# Altium PCB Solenoid-Board-v2.0.PcbDoc (part 3 of 3)
Units mil, origin at the board's own origin, x right, y up, seen from the top; angles counter-clockwise.
Board outline 3149.61 x 4330.71 mil, 2 copper layers (Top Layer, Bottom Layer), stack 61.811 mil thick; 169 components, 111 nets, 466 pads, 161 vias.
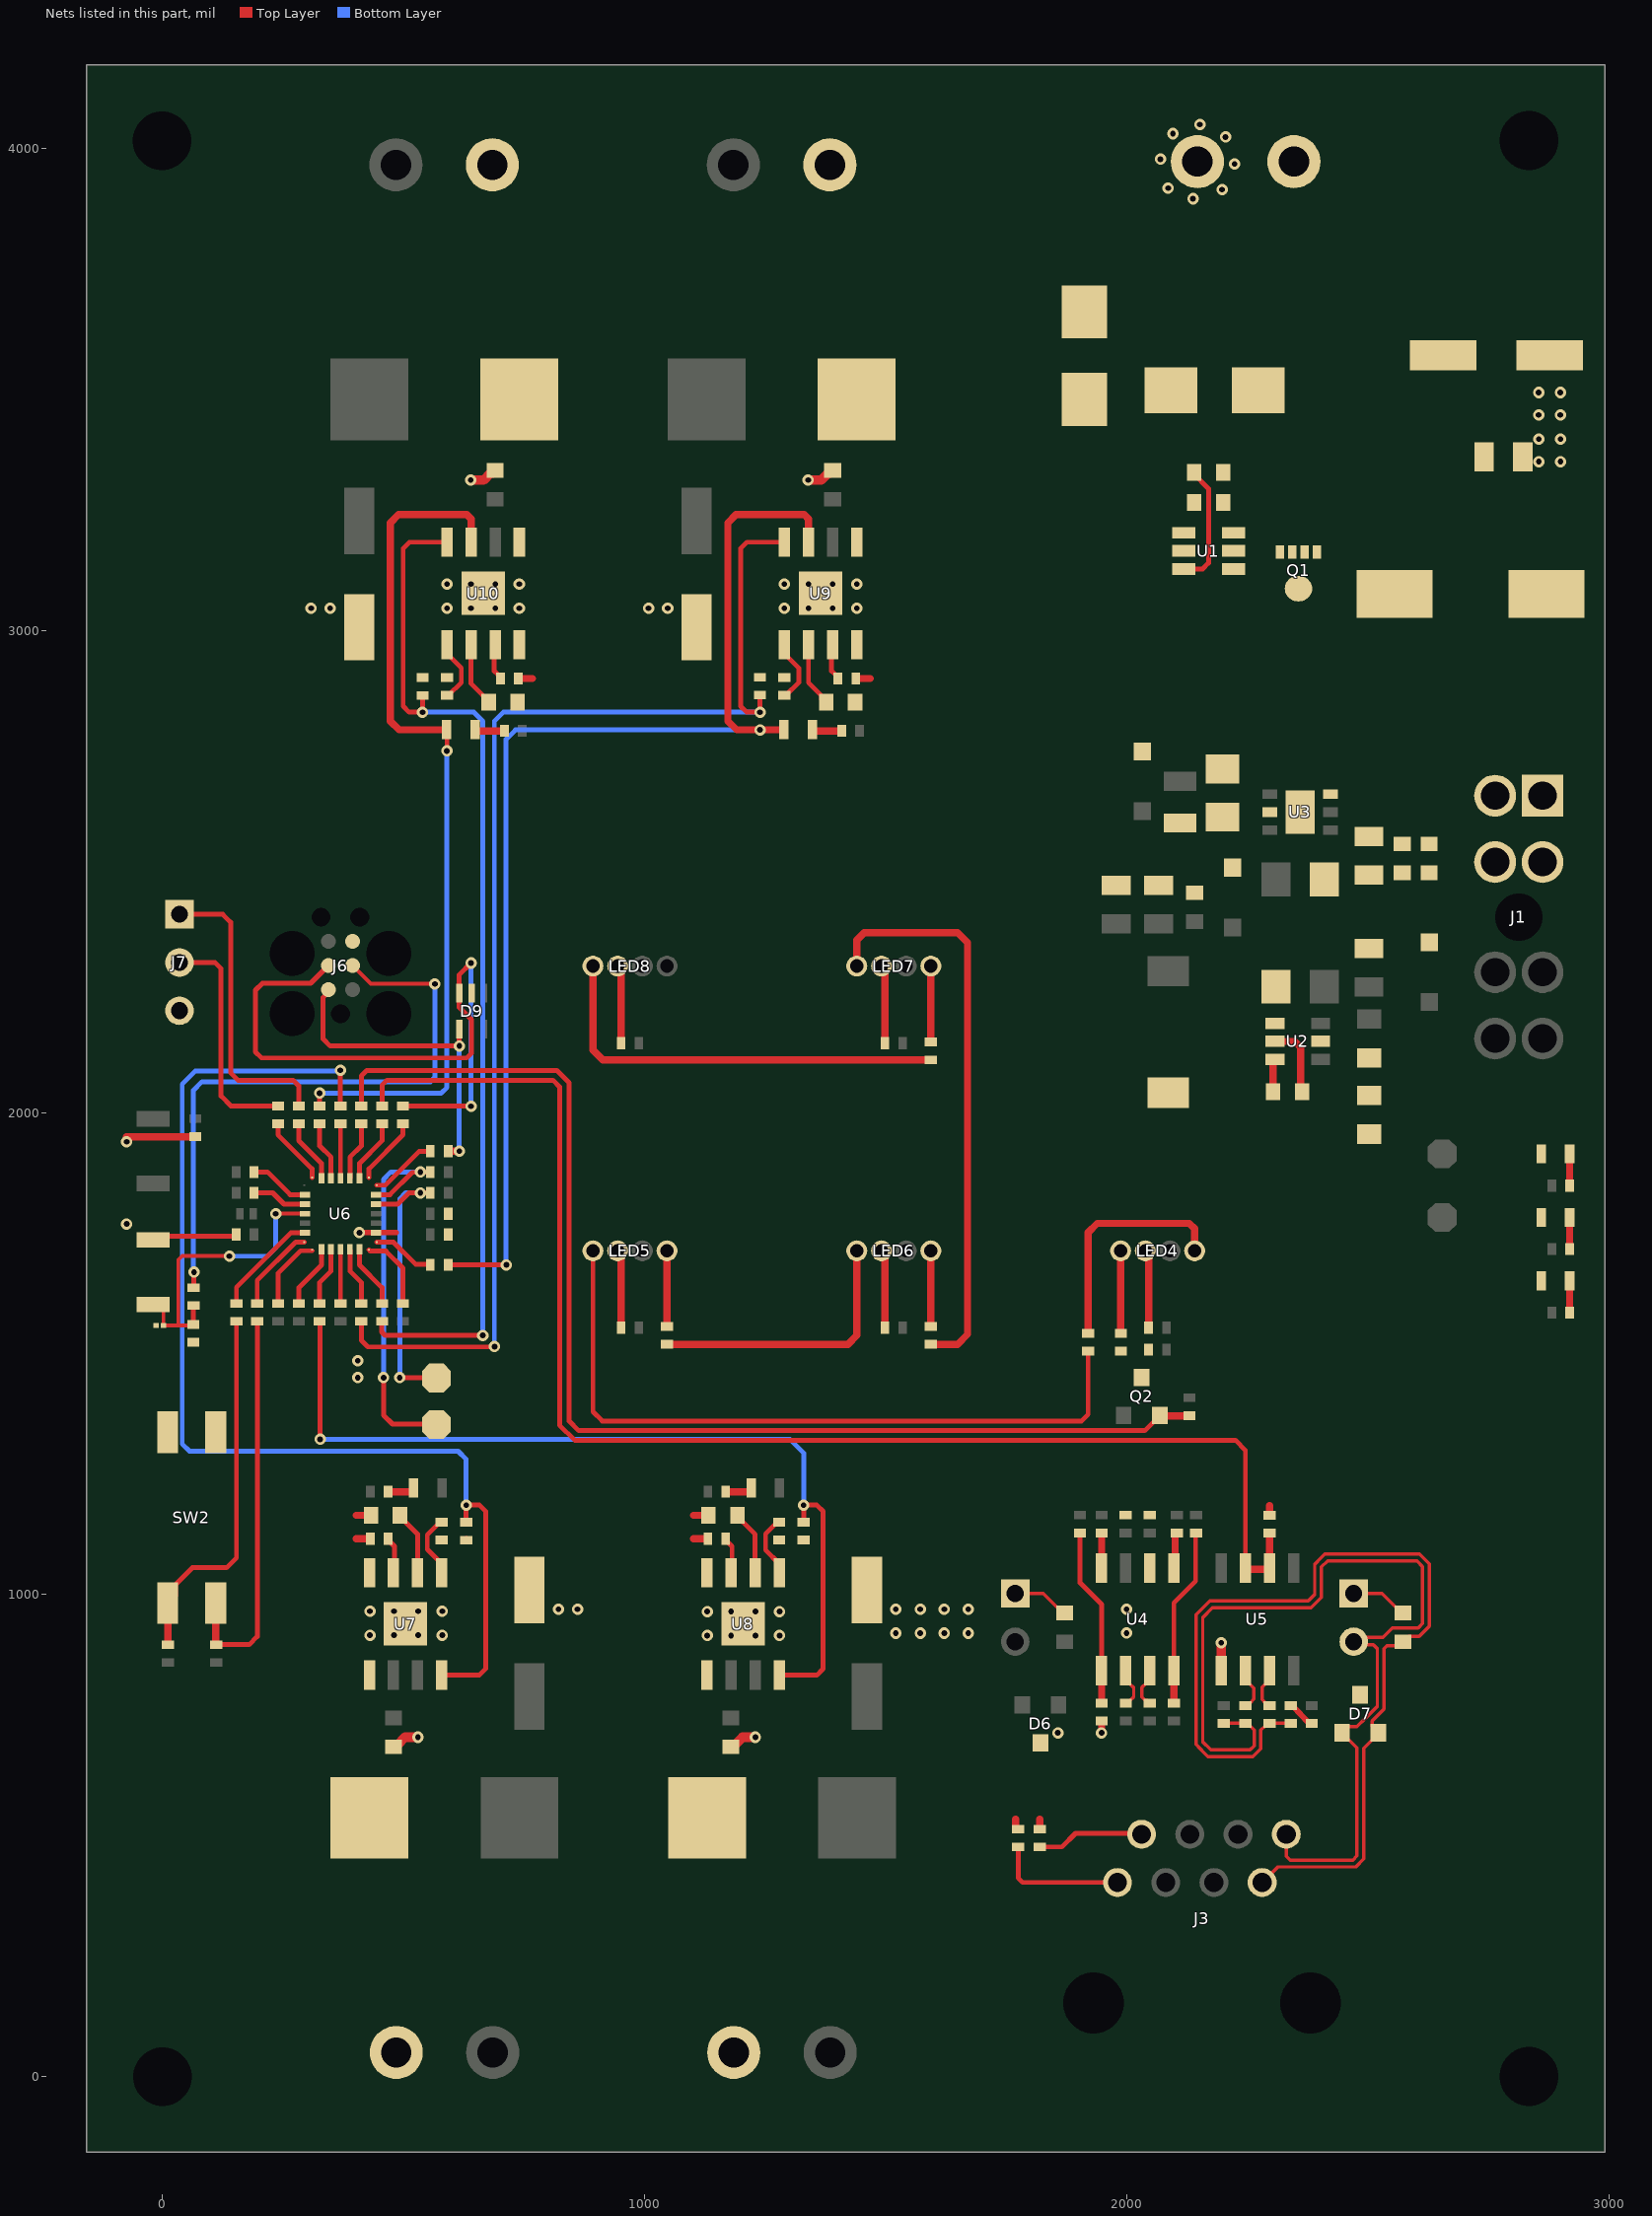
[diagram p2: the nets of this part, all layers, seen from the top]

## Via types
v1: diameter 23.62, hole 11.81, Top Layer to Bottom Layer, tented both sides, 161 vias

## Nets (pads, with @x,y where several pads share a name; then routed paths per layer and width w, separated by ;. In a path a pad name is that pad's centre, name@x,y a point inside that pad or via, vN(x,y) a via of type N, cw(c..) or ccw(c..) an arc to the next point about the centre after c; other vN are vias at no path point) (continued)
DI_PB1: LED11.2 R29.1 U9.7 | length 2507.9
  Top Layer w6: R29.1@594.43,1681.38 R29.1@596.85,1683.81
  Top Layer w10: R29.1@596.85,1683.81 v1(713.47,1683.81) ; LED11.2@1288.42,2795.4 LED11.2@1289.31,2794.51
  Top Layer w15: LED11.2@1290.15,2793.67 v1(1239.42,2793.67) 1191.13,2793.67 1172.83,2811.97 1172.83,3223.1 1189.73,3240 1331.36,3240 1340.15,3231.21 U9.7@1340.15,3182.98
  Bottom Layer w10: v1@712.64,1684.64 712.64,2774.21 732.1,2793.67 v1(1239.42,2793.67)
DI_PB5: LED12.2 R36.1 U10.7 | length 1801.4
  Top Layer w10: R36.1@326.15,2013.32 v1(326.15,2040) ; LED12.2@589.31,2794.51 590.2,2793.62 590.2,2750.91 v1@591.1,2750.02
  Top Layer w15: LED12.2@590.15,2793.67 491.13,2793.67 472.83,2811.97 472.83,3223.1 489.73,3240 631.36,3240 640.15,3231.21 U10.7@640.15,3182.98
  Bottom Layer w10: v1(326.15,2040) 578.04,2040 590,2051.96 590,2748.92 v1@591.1,2750.02
  other v1: 590,2750.02
DO_PA15: R22.1 R48.1 U5.2 U5.3 | length 2956.4
  Top Layer w10: R48.1@455.68,2013.32 455.68,2056.59 465.93,2066.83 810.26,2066.83 823.87,2053.22 823.87,1351.41 855.29,1320 2225.67,1320 2246.38,1299.28 U5.3@2246.38,1055.05 ; R22.1@2296.36,1127.35 2296.44,1127.27 2296.44,1103.43 2296.52,1103.35
  Top Layer w15: U5.3@2248.74,1052.7 2294.03,1052.7 U5.2@2296.36,1055.03 ; U5.2@2296.36,1055.07 R22.1@2296.36,1127.35
GND: C1.2 C2.2 C3.1 C4.1 C5.1 C6.1 C9.1 C10.1 C11.1 C12.1 C13.1 C14.1 C15.1 C16.1 C17.1 C18.1 C19.1 C20.1 C21.1 C22.1 C23.1 C24.1 C25.2 C26.2 C27.2 C28.2 C29.2 C30.1 C31.1 C32.1 C33.1 C34.2 C35.2 C36.1 C37.1 C38.1 C39.1 D2.1 D3.2 D4.1 D5.1 D6.3 D7.3 D8.1 D9.2 J2.1 J6.5 J7.3 LED1.2 LED2.2 LED3.2 LED4.3 LED5.3 LED6.3 LED7.3 LED8.3 R4.1 R12.1 R13.1 R18.1 R22.2 R51.1 R55.1 R56.1 R57.1 R58.1 R59.1 R60.1 R63.1 R64.1 R65.1 R66.1 R67.1 R68.1 R72.2 SW1.2 SW2.3 SW2.4 U1.2 U2.4 U3.6 U3.7 U4.2 U5.5 U6.16 U7.4 U7.9 U8.4 U8.9 U9.4 U9.9 U10.4 U10.9 | length 1822.5
  Top Layer w8: R13.1@1769.96,513.46 R13.1@1770,513.5 ; R12.1@1819.96,513.46 R12.1@1820,513.5 ; C16.1@1997.55,1164.8 C16.1@1997.59,1164.84 ; R22.2@2296.36,1164.35 R22.2@2296.37,1164.35 ; C17.1@2048.05,1164.81 C17.1@2048.09,1164.84
  Top Layer w10: SW1.2@-19.36,1735.64 -11.62,1743.38 142.57,1743.38 ; C27.2@149.57,1743.38 C27.2@153.08,1746.89
  Top Layer w11: v1(408.7,1750.7) U6.16@443.15,1750.7 485.25,1750.7
  Top Layer w12: R72.2@2340.38,769.84 2346.88,766.84 C19.1@2375.88,735.34
  Top Layer w15: v1@-74.27,1949.09 -73.73,1949.63 67.4,1949.63 R51.1@67.93,1950.16 ; 401.7,1164.52 C31.1@432.77,1164.52 C31.1@437.77,1164.52 ; 401.74,1115.72 R57.1@431.27,1115.72 ; R55.1@630,1113.81 R55.1@630,1114.4 ; R68.1@738.15,2900.02 767.68,2900.03 ; LED5.3@944.24,1713.57 951.48,1706.33 C22.1@951.48,1553.71 ; LED8.3@944.24,2303.57 951.48,2296.33 C18.1@951.48,2143.71 ; 1101.7,1164.52 C33.1@1137.77,1164.52 ; 1101.74,1115.72 R60.1@1131.27,1115.72 ; R65.1@1438.15,2900.03 1467.68,2900.03 ; LED6.3@1491.37,1713.57 1498.6,1706.33 C21.1@1498.6,1553.71 ; LED7.3@1491.36,2303.57 1498.6,2296.33 C23.1@1498.6,2143.71 ; R13.1@1770,513.5 1770,534.12 ; R12.1@1820,513.5 1820,534.12 ; v1(1948.09,713.23) 1948.09,727.54 ; 1948.09,727.56 R18.1@1948.09,737.85 ; LED4.3@2034.89,1709.19 2045.7,1698.38 C20.1@2045.7,1553.02 ; R22.2@2296.37,1164.35 2296.37,1184.97
  Top Layer w20: C30.1@479.27,684.05 484.27,689.05 488.17,689.05 503.17,704.05 v1(530,704.05) ; v1(639.41,3311.71) 666.24,3311.71 681.24,3326.71 685.14,3326.71 C38.1@690.14,3331.71 ; C32.1@1179.28,684.04 1184.28,689.04 1188.18,689.04 1203.18,704.04 v1(1230,704.04) ; v1(1339.42,3311.7) 1366.24,3311.7 1381.24,3326.7 1385.14,3326.7 C36.1@1390.14,3331.7 ; U5.5@2196.38,842.45 v1(2196.38,900)
  other v1: 1857.39,713.23 1130,915 1179.72,915 1230.28,915 1280,915 430.39,915.68 480.11,915.68 530.68,915.68 580.4,915.68 1521.33,919.86 1571.89,919.86 1621.61,919.86 1671.33,919.86 1999.72,920 1130,964.72 1179.72,964.72 1230.28,964.72 1280,964.72 430.39,965.4 480.11,965.4 530.68,965.4 580.4,965.4 821.33,969.58 861.05,969.58 1521.33,969.58 1571.89,969.58 1621.61,969.58 1671.33,969.58 1999.72,969.72 405,1450 405,1485 -74.27,1768.74 -74.27,1939.09 308.37,3046.17 348.09,3046.17 590.15,3046.17 639.87,3046.17 690.43,3046.17 740.15,3046.17 1008.37,3046.17 1048.09,3046.17 1290.15,3046.17 1339.87,3046.17 1390.43,3046.17 1440.15,3046.17 590.15,3095.88 639.87,3095.88 690.43,3095.88 740.15,3095.88 1290.15,3095.88 1339.87,3095.88 1390.43,3095.88 1440.15,3095.88 2855,3350.14 2900,3350.14 2855,3396.78 2900,3396.78 2854.61,3446.79 2899.61,3446.79 2854.61,3493.43 2899.61,3493.43 2137.59,3895.48 2197.9,3914.47 2086,3917.54 2223.99,3967.46 2069.99,3977.46 2204.97,4023.37 2096.08,4030.44 2151.99,4049.46
ID0: R26.1 R42.1 SW2.1 | length 771.2
  Top Layer w10: SW2.1@11.52,982.19 27.2,997.87 27.2,1020.83 61.98,1055.61 133.07,1055.61 153.44,1075.99 R26.1@153.44,1566.81
  Top Layer w15: R42.1@11.52,896.06 SW2.1@11.52,982.19
ID1: R28.1 R41.1 SW2.2 | length 832.7
  Top Layer w4: R41.1@110.55,897.04 R41.1@111.52,896.06
  Top Layer w10: R41.1@111.52,896.06 180,896.06 196.81,912.87 R28.1@196.81,1566.81
  Top Layer w15: R41.1@110.55,897.04 SW2.2@110.55,982.19
IN-1: R33.1 R55.2 U7.8 | length 2361.6
  Top Layer w10: v1(369,2087.62) 369.16,2087.46 369.16,2013.49 R33.1@369.33,2013.32 ; U7.8@579.27,832.77 657.15,832.77 670.22,845.84 670.22,1172.76 657.52,1185.46 v1(630,1185.46) R55.2@630,1150.81
  Bottom Layer w10: v1(369,2087.62) 367.57,2086.2 68.4,2086.2 41.07,2058.87 41.07,1312.23 56.01,1297.3 613.4,1297.3 630,1280.7 v1(630,1185.46)
IN-2: R35.1 R58.2 U8.8 | length 1871.4
  Top Layer w10: v1@326.59,1322.54 R35.1@326.59,1566.37 ; U8.8@1279.27,832.77 1357.15,832.77 1370.22,845.84 1370.22,1172.76 1357.52,1185.46 v1(1330,1185.47) R58.2@1330,1150.81
  Top Layer w15: R35.1@326.15,1566.81 R35.1@326.59,1566.37 ; v1@326.59,1322.54 v1(327.03,1322.1)
  Bottom Layer w10: v1(327.03,1322.1) 1301.44,1322.12 1330,1293.57 v1(1330,1185.47)
IN-3: R39.1 R63.2 U9.8 | length 2680.6
  Top Layer w10: R39.1@412.51,1566.81 412.51,1527.4 426.14,1513.77 v1@688.94,1513.77 ; R63.2@1239.42,2864.94 v1(1239.42,2830.29) 1211.9,2830.29 1199.2,2842.98 1199.2,3169.91 1212.27,3182.98 U9.8@1290.15,3182.98
  Bottom Layer w10: v1@688.51,1514.82 688.51,2811.96 706.83,2830.29 v1(1239.42,2830.29)
  other v1: 688.94,1514.39
IN-4: R43.1 R66.2 U10.8 | length 2145.2
  Top Layer w10: R43.1@455.68,1566.81 455.68,1563.75 454.74,1562.81 454.74,1544.89 462.05,1537.58 v1(664.52,1537.58) ; R66.2@539.42,2864.94 v1(539.42,2830.29) 511.9,2830.29 499.2,2842.98 499.2,3169.91 512.27,3182.98 U10.8@590.15,3182.98
  Bottom Layer w10: v1(539.42,2830.29) 646.03,2830.29 664.52,2811.8 v1@664.52,1537.93
LED: Q2.2 R31.1 R52.1 | length 2518.4
  Top Layer w10: R31.1@412.51,2013.32 412.51,2075.8 423.68,2086.97 818.41,2086.97 843.87,2061.5 843.87,1359.7 863.57,1340 2037.68,1340 2056.2,1358.52 2057.47,1358.52 2068.61,1369.66 Q2.2@2068.61,1370.93
  Top Layer w15: Q2.2@2069,1370.69 R52.1@2130.09,1370.69
LED1_DIN: LED4.4 R54.2 | length 171.5
  Top Layer w15: R54.2@1987.54,1541.47 LED4.4@1987.54,1713.02
LED1_DOUT: LED5.4 R11.2 | length 1505.6
  Top Layer w10: LED5.4@893.06,1713.02 893.06,1379.07 912.14,1360 1906.49,1360 1920,1373.51 R11.2@1920,1504.77
LED2_DOUT: LED6.4 R23.2 | length 576.8
  Top Layer w15: R23.2@1046.61,1519.06 1421.8,1519.07 1440.3,1537.57 LED6.4@1440.3,1713.02
LED3_DOUT: LED7.4 R24.2 | length 1196.1
  Top Layer w15: LED7.4@1440.3,2303.57 1440.3,2357.6 1455.7,2373 1649.5,2373 1669.97,2352.52 1669.97,1539.6 1649.44,1519.07 R24.2@1593.85,1519.06
LED4_DOUT: LED8.4 R25.2 | length 883.4
  Top Layer w15: LED8.4@893.06,2303.57 893.06,2129.36 913.36,2109.07 R25.2@1593.84,2109.07
NetC2_1: C2.1 C3.2 C7.2 D1.2 J2.2 Q1.1 Q1.2 Q1.3 R1.1 U1.6
NetC7_1: C7.1 U1.1
NetC8_1: C8.1 L1.1 U2.5 | length 153.4
  Top Layer w15: U2.5@2307.62,2147.47 2348.72,2147.47 2360.94,2135.25 2360.94,2049.88 C8.1@2367.76,2043.06
NetC8_2: C8.2 U2.6 | length 68.6
  Top Layer w15: C8.2@2303.76,2043.06 2303.76,2106.21 U2.6@2307.62,2110.07
NetC15_2: C15.2 F1.1 U3.2
NetC31_2: C31.2 U7.2 | length 134.3
  Top Layer w10: C31.2@492.77,1164.52 502.77,1154.52 502.77,1151.91 529.27,1125.41 U7.2@529.27,1045.37
NetC33_2: C33.2 U8.2 | length 134.3
  Top Layer w10: C33.2@1192.76,1164.51 1202.76,1154.51 1202.76,1151.41 1229.27,1124.9 U8.2@1229.27,1045.37
NetC37_2: C37.2 U9.2 | length 131.5
  Top Layer w10: U9.2@1340.15,2970.38 1340.15,2891.46 1366.66,2864.95 1366.66,2856.92 C37.2@1371.65,2851.93
NetC39_2: C39.2 U10.2 | length 132
  Top Layer w10: U10.2@640.15,2970.38 640.15,2889.42 665.83,2863.74 666.66,2863.74 671.65,2858.74 C39.2@671.65,2851.93
NetD1_1: D1.1 D3.1
NetD10_2: D10.2 J8.2 U7.5
NetD11_2: D11.2 J9.2 U8.5
NetD12_2: D12.2 J10.2 U9.5
NetD13_2: D13.2 J11.2 U10.5
NetJ3_7: J3.7 R12.2 | length 223.5
  Top Layer w10: R12.2@1820,476.5 1865.85,476.5 1894.01,504.66 2029.11,504.66 J3.7@2031.04,502.74
NetJ3_8: J3.8 R13.2 | length 274.4
  Top Layer w10: R13.2@1775,476.5 1775,411.97 1784.24,402.74 J3.8@1981.04,402.74
NetJ4_1: J4.1 R16.1 | length 116.2
  Top Layer w7: J4.1@1768.83,1002.24 1827.35,1002.24 R16.1@1868.13,961.45
NetJ5_1: J5.1 R21.1 | length 116.2
  Top Layer w7: J5.1@2471.04,1002.24 2529.56,1002.24 R21.1@2570.35,961.45
NetJ6_3: J6.3 R34.1 | length 1306.2
  Top Layer w4: R34.1@64.63,1636.42 R34.1@65.46,1637.25
  Top Layer w8: J6.3@394.33,2304.85 432.52,2266.66 v1(565,2266.66)
  Top Layer w10: R34.1@64.47,1636.58 R34.1@64.63,1636.42 ; R34.1@65.46,1637.25 v1(65.46,1668.71)
  Bottom Layer w10: v1(65.46,1668.71) 64.31,1669.86 64.31,2046.16 81.96,2063.81 555.93,2063.81 565,2072.88 v1(565,2266.66) v1@565,2270
NetLED1_1: LED1.1 R2.2 | length 66
  Top Layer w15: R2.2@2918.92,1848.3 2918.97,1848.35 2918.97,1914.26 LED1.1@2919.01,1914.3
NetLED2_1: LED2.1 R5.2 | length 65.8
  Top Layer w15: R5.2@2918.92,1716.58 2918.97,1716.62 2918.97,1782.27 LED2.1@2919.01,1782.31
NetLED3_1: LED3.1 R6.2 | length 65.8
  Top Layer w15: R6.2@2918.92,1584.86 2918.97,1584.9 2918.97,1650.54 LED3.1@2919.01,1650.58
NetLED4_1: LED4.1 R11.1 | length 489.1
  Top Layer w15: R11.1@1920,1541.77 1920,1751.19 1938.81,1770 2130,1770 2141.08,1758.92 LED4.1@2141.08,1713.02 LED4.1@2141.28,1712.82
NetLED5_1: LED5.1 R23.1 | length 156.9
  Top Layer w15: R23.1@1046.61,1556.06 LED5.1@1046.6,1713.02
NetLED6_1: LED6.1 R24.1 | length 156.9
  Top Layer w15: R24.1@1593.85,1556.06 LED6.1@1593.84,1713.02
NetLED7_1: LED7.1 R25.1 | length 157.5
  Top Layer w15: R25.1@1593.84,2146.07 LED7.1@1593.84,2303.57
NetLED9_1: LED9.1 R61.1 | length 56.8
  Top Layer w15: R61.1@468.22,1213.24 514.21,1213.24 521.05,1220.08 LED9.1@521.05,1221.24
NetLED10_1: LED10.1 R62.1 | length 56.8
  Top Layer w15: R62.1@1168.21,1213.23 1214.21,1213.24 1221.05,1220.08 LED10.1@1221.05,1221.24
NetLED11_1: LED11.1 R69.1 | length 62.4
  Top Layer w15: LED11.1@1348.37,2794.51 1348.37,2793.86 1350.71,2791.51 R69.1@1409.18,2791.49
NetLED12_1: LED12.1 R70.1 | length 54.5
  Top Layer w15: LED12.1@648.37,2794.51 648.37,2793.86 650.71,2791.51 R70.1@701.2,2791.51
NetQ1_4: Q1.4 U1.5
NetQ2_3: Q2.3 R53.1 R54.1
NetR1_2: R1.2 U1.3 | length 257
  Top Layer w10: U1.3@2118.49,3127.64 2157.81,3127.64 2170,3139.83 2170,3293.99 2139.06,3324.93 R1.2@2139.06,3327.43
NetR3_1: R3.1 R4.2 U2.2
NetR7_1: R7.1 R8.2 U4.8 | length 371.6
  Top Layer w10: U4.8@2098.09,842.45 2098.09,982.84 2143.08,1027.83 R8.2@2143.08,1127.85
  Top Layer w15: R7.1@2098.09,774.85 U4.8@2098.09,842.45
NetR9_2: R9.2 U4.1 | length 76.5
  Top Layer w15: U4.1@2098.09,1055.05 2100.55,1057.52 2100.55,1126.35 2102.05,1127.85 R9.2@2104.09,1127.85
NetR10_1: R10.1 U4.7 | length 83.6
  Top Layer w7: R10.1@2048.09,774.84 2042.59,780.34 2038.56,780.34 2031.69,787.21 2031.69,807.35 2039.78,815.44 2048.09,823.75 U4.7@2048.09,842.45
NetR14_2: R14.2 U4.4 | length 72.8
  Top Layer w15: U4.4@1948.09,1055.05 R14.2@1948.09,1127.84
NetR15_1: R15.1 U4.6 | length 79.9
  Top Layer w7: U4.6@1998.09,842.45 1998.09,823.75 2006.4,815.44 2014.63,807.21 2014.63,787.88 2007.09,780.34 R15.1@2001.59,774.84
NetR17_2: R17.2 R18.2 U4.5 | length 371.6
  Top Layer w10: R17.2@1903.09,1127.84 1903.09,1024.63 1948.09,979.63 U4.5@1948.09,842.45
  Top Layer w15: R18.2@1948.09,774.85 U4.5@1948.09,842.45
NetR19_1: R19.1 U5.7 | length 75.9
  Top Layer w7: R19.1@2287.38,775.65 2280.89,782.14 2280.89,808.26 2288.07,815.44 2296.38,823.75 U5.7@2296.38,842.45
NetR20_1: R20.1 U5.6 | length 89.7
  Top Layer w7: R20.1@2246.39,769.84 2251.88,775.34 2256.27,775.34 2263.89,782.96 2263.89,806.24 2254.7,815.44 2246.38,823.75 U5.6@2246.38,842.45
NetR56_2: R56.2 U7.1 | length 131.6
  Top Layer w10: U7.1@579.27,1045.37 579.27,1064.07 549.49,1093.85 549.49,1123.93 575.77,1150.22 R56.2@579.27,1150.22
NetR57_2: R57.2 U7.3 | length 77.2
  Top Layer w10: R57.2@468.27,1115.72 468.27,1112.22 472.27,1108.22 473.12,1108.22 481.47,1099.87 481.47,1047.56 U7.3@479.27,1045.37
NetR59_2: R59.2 U8.1 | length 130.2
  Top Layer w10: U8.1@1279.27,1045.37 1279.27,1064.07 1251.19,1092.15 1251.19,1125.63 1275.78,1150.22 R59.2@1279.28,1150.22
NetR60_2: R60.2 U8.3 | length 77.2
  Top Layer w10: R60.2@1168.27,1115.72 1168.27,1112.22 1172.27,1108.22 1173.12,1108.22 1181.47,1099.87 1181.47,1047.56 U8.3@1179.27,1045.37
NetR64_2: R64.2 U9.1 | length 131.6
  Top Layer w10: R64.2@1290.14,2865.53 1293.64,2865.53 1319.93,2891.82 1319.93,2921.9 1290.14,2951.69 U9.1@1290.15,2970.38
NetR65_2: R65.2 U9.3 | length 77.2
  Top Layer w10: U9.3@1390.15,2970.38 1387.95,2968.19 1387.95,2915.88 1396.3,2907.53 1397.15,2907.53 1401.15,2903.53 R65.2@1401.15,2900.03
NetR67_2: R67.2 U10.1 | length 131.6
  Top Layer w10: R67.2@590.14,2865.53 593.64,2865.53 619.93,2891.82 619.93,2921.9 590.14,2951.69 U10.1@590.15,2970.38
NetR68_2: R68.2 U10.3 | length 77.2
  Top Layer w10: U10.3@690.15,2970.38 687.95,2968.19 687.95,2915.88 696.3,2907.53 697.15,2907.53 701.15,2903.53 R68.2@701.15,2900.02
NRST_MCU: C24.2 D8.2 R34.2 SW1.1 U6.4 | length 638.9
  Top Layer w8: SW1.1@-19.36,1601.78 -9.92,1601.78 2.22,1589.64 D8.2@2.22,1558.14 ; D8.2@3.54,1558.14 32.92,1558.14 ; C24.2@64.3,1560.14 62.3,1558.14 32.92,1558.14 ; R34.2@64.3,1599.09 R34.2@64.63,1599.42 ; v1(138.81,1702) 41.07,1702 32.92,1693.84 32.92,1558.14 ; v1(235,1790) U6.4@295.51,1790.07
  Top Layer w10: C24.2@64.3,1560.14 R34.2@64.3,1599.09
  Bottom Layer w10: v1(138.81,1702) 218.11,1702 235,1718.89 v1(235,1790)
PA0: R26.2 U6.6 | length 222.5
  Top Layer w10: R26.2@153.44,1603.81 153.44,1637.33 266.81,1750.7 U6.6@295.51,1750.7
PA1: R28.2 U6.7 | length 178.5
  Top Layer w10: R28.2@196.62,1603.81 196.62,1651.42 276.21,1731.01 U6.7@294.53,1731.01
PA2: R30.2 U6.8 | length 154.3
  Top Layer w10: R30.2@239.8,1601.84 R30.2@239.8,1603.81 239.8,1666.31 286.59,1713.11 310.27,1713.11
PA3: R32.2 U6.9 | length 131.9
  Top Layer w10: R32.2@282.97,1601.84 282.97,1636.63 329.96,1683.61 U6.9@329.96,1714.28
PA4: R35.2 U6.10 | length 122.2
  Top Layer w10: R35.2@326.15,1601.84 326.15,1647.58 349.64,1671.07 U6.10@349.64,1714.28
PA5: R37.2 U6.11 | length 112.4
  Top Layer w10: R37.2@369.33,1601.84 U6.11@369.33,1714.28
PA6: R39.2 U6.12 | length 122.2
  Top Layer w10: U6.12@389.01,1714.28 389.01,1671.07 412.51,1647.58 R39.2@412.51,1601.84
PA7: R43.2 U6.13 | length 131.9
  Top Layer w10: U6.13@408.7,1714.28 408.7,1683.61 455.68,1636.63 R43.2@455.68,1601.84
PA11: R44.2 TP3.1 U6.19 | length 617.3
  Top Layer w10: U6.19@443.15,1809.75 487.87,1809.75 511.37,1833.24 R44.2@555.57,1833.24 ; v1(492.31,1450) 567.26,1450 TP3.1@568.23,1449.03
  Bottom Layer w10: v1(492.31,1450) 492.31,1820.74 504.81,1833.25 v1(535.17,1833.25)
PA12: R45.2 TP4.1 U6.20 | length 821.3
  Top Layer w10: U6.20@443.15,1829.44 471.8,1829.44 518.26,1875.89 534.64,1875.89 v1(535.17,1876.42) R45.2@555.58,1876.42 ; v1(458.69,1450) 458.69,1372.07 477.22,1353.54 567.26,1353.54 TP4.1@568.23,1352.57
  Bottom Layer w10: v1(458.69,1450) 458.69,1861 474.1,1876.42 v1(535.17,1876.42)
PA13: R46.1 U6.21 | length 140.6
  Top Layer w10: U6.21@444.13,1849.12 462.44,1849.12 532.92,1919.6 R46.1@555.58,1919.59
PA14: R47.1 U6.22 | length 140.6
  Top Layer w10: U6.22@428.38,1864.87 428.38,1883.18 498.86,1953.66 R47.1@498.86,1976.32
PA15: R48.2 U6.23 | length 131.9
  Top Layer w10: U6.23@408.7,1863.88 408.7,1894.55 455.68,1941.54 R48.2@455.68,1976.32
PB0: R27.2 U6.14 | length 161.6
  Top Layer w10: U6.14@428.38,1715.26 431.36,1712.28 463.83,1712.28 498.86,1677.25 R27.2@498.86,1603.81 R27.2@498.86,1601.84
PB1: R29.2 U6.15 | length 130.4
  Top Layer w10: U6.15@444.13,1731.01 479.09,1731.01 524.88,1685.22 R29.2@555.58,1685.22
PB3: R31.2 U6.24 | length 122.2
  Top Layer w10: U6.24@389.01,1863.88 389.01,1907.09 412.51,1930.59 R31.2@412.51,1976.32
PB4: R33.2 U6.25 | length 112.4
  Top Layer w10: U6.25@369.33,1863.88 R33.2@369.33,1976.32
PB5: R36.2 U6.26 | length 122.2
  Top Layer w10: R36.2@326.15,1976.32 326.15,1930.59 349.64,1907.09 U6.26@349.64,1863.88
PB6: R38.2 U6.27 | length 131.9
  Top Layer w10: R38.2@282.97,1976.32 282.97,1941.54 329.96,1894.55 U6.27@329.96,1863.88
PB7: R40.2 U6.28 | length 140.6
  Top Layer w10: R40.2@239.8,1976.32 239.8,1953.66 310.27,1883.18 U6.28@310.27,1864.87
PF0: R49.2 U6.2 | length 124.9
  Top Layer w10: R49.2@190.08,1876.42 217.86,1876.42 264.84,1829.44 U6.2@295.51,1829.44
PF1: R50.2 U6.3 | length 115.2
  Top Layer w10: R50.2@190.08,1833.24 228.81,1833.24 252.3,1809.75 U6.3@295.51,1809.75
RS485_N: D7.2 J3.2 R19.2 R21.2 R72.1 | length 2034.9
  Top Layer w7: J3.2@2281.05,402.74 2313.43,435.12 2475.09,435.12 2491.94,451.97 2491.94,681.33 2509.14,698.53 2509.14,698.74 2515.16,704.76 D7.2@2515.37,704.76 ; R72.1@2340.38,732.84 R19.2@2296.39,732.84 2290.89,727.34 2287.22,727.34 2278.39,718.5 2278.39,680.3 2261.86,663.77 2168.9,663.77 2160.7,671.97 2152.06,680.61 2143.86,688.81 2143.86,958.17 2172.4,986.71 2376.73,986.71 2390.04,1000.03 2390.04,1062.89 2402.95,1075.8 2411.15,1084 2607.73,1084 2627.93,1063.8 2627.93,934.25 2606.95,913.27 2584.92,913.27 R21.2@2573.42,901.77 2565.49,893.83 2540.31,893.83 2533.92,887.44 2533.92,762.43 2525.72,754.23 2509.35,737.86 2509.35,725.78 D7.2@2521.78,713.35
RS485_P: D7.1 J3.1 J5.2 R20.2 R71.1 | length 2030.3
  Top Layer w7: R71.1@2201.38,732.84 R20.2@2246.39,732.84 2251.89,727.34 2256.2,727.34 2264.39,719.15 2264.39,686.1 2256.06,677.77 2174.7,677.77 2157.86,694.61 2157.86,952.37 2178.2,972.71 2382.53,972.71 2404.04,994.23 2404.04,1057.09 2416.95,1070 2601.93,1070 2613.93,1058 2613.93,940.05 2604.87,930.98 2551.59,930.98 2531.81,911.2 2480.01,911.2 J5.2@2471.04,902.24 2477.81,895.47 2511.84,895.47 2519.92,887.39 2519.92,768.23 2495.35,743.66 2477.68,725.99 D7.1@2444.62,725.99 ; J3.1@2331.04,502.74 2331.04,457.11 2339.03,449.12 2469.29,449.12 2477.94,457.77 2477.94,681.77 2460.97,698.74 D7.1@2444.62,698.74
SWCLK: D9.3 J6.4 R47.2 | length 1403.8
  Top Layer w10: J6.4@344.33,2304.85 307.58,2268.1 207.41,2268.1 193.04,2253.73 193.04,2125.63 205.48,2113.19 631.34,2113.19 641.33,2123.19 641.33,2192.35 615.74,2217.94 D9.3@615.74,2247.47 615.74,2285.74 v1(640,2310) ; R47.2@498.86,2013.32 499.02,2013.16 v1@640,2013.16
  Bottom Layer w10: v1(640,2013) v1(640,2310)
SWDIO: D9.4 J6.2 R46.2 | length 678
  Top Layer w10: J6.2@344.33,2254.85 344.33,2249.45 333.38,2238.5 333.38,2152.49 347.93,2137.94 v1(615.74,2137.94) D9.4@615.74,2172.66 ; R46.2@592.58,1919.59 592.58,1920.75 R46.2@596.58,1924.75
  Top Layer w15: R46.2@592.58,1919.59 v1(616,1919.59)
  Bottom Layer w10: v1@615.37,1919.59 v1@615.37,2137.31
USART1_RX: J7.2 R40.1 | length 482.8
  Top Layer w10: J7.2@35.34,2311.13 108.92,2311.13 121.52,2298.53 121.52,2033.98 142.18,2013.32 R40.1@239.8,2013.32
USART1_TX: J7.1 R38.1 | length 619.9
  Top Layer w10: J7.1@35.34,2411.13 125.05,2411.13 141.52,2394.66 141.52,2082.18 156.86,2066.83 271.14,2066.83 282.97,2055 R38.1@282.97,2013.32
VIN: C1.1 C4.2 C5.2 C6.2 J1.1 J1.2 J1.7 J1.8 Q1.5 U1.4
pads on no net: D9.1 D9.5 J1. J3. J3.3 J3.6 J6.6 J6.MP1 J6.MP2 J6.MP3 J6.MP4 J6.MP5 J6.MP6 J6.MP7 LED8.1 U3.1 U3.4 U3.5

## Polygon pours and split planes (outlines as drawn)
GND on Top Layer "GND_L01_P214" (solid, remove dead copper, pour order 214): -117.84,-117.1 -117.84,4130.85 2951.38,4130.85 2951.38,-117.1
VIN on Top Layer "VIN_L01_P201" (solid, pour order 201): 2184.06,3139.84 2245.66,3139.84 2245.66,3124.84 2283,3124.84 2950,3124.84 2950,2415 2699.45,2415 2699.45,2542.14 2465,2542.14 2465,2795 2184.06,2795
NetC2_1 on Top Layer "NETC2_1_L01_P213" (solid, pour order 213): 2950,3625.52 2771.26,3625.52 2771.26,3149.25 2335.27,3149.25 2335.27,3190.24 2185.48,3190.24 2185.48,3545.31 2270,3545.31 2270,4130.85 2950,4130.85
24V on Top Layer "24V_L01_P208" (solid, pour order 208): 1540.16,-7 1531.16,-16 1494.16,-16 1315.16,-16 1305.74,-6.59 1305.74,654.83 1429.07,654.83 1429.07,863.28 1540.16,863.28
24V on Top Layer "24V_L01_P181" (solid, remove dead copper, pour order 181): 2379.84,2299.57 2699.47,2299.57 2699.47,2390 2950,2390 2950,2095 2379.84,2095
24V on Top Layer "24V_L01_P212" (solid, pour order 212): 1029.26,4022.75 1038.26,4031.75 1075.26,4031.75 1254.26,4031.75 1263.67,4022.34 1263.67,3360.92 1140.35,3360.92 1140.35,3152.47 1029.26,3152.47
NetD12_2 on Top Layer "NETD12_2_L01_P211" (solid, pour order 211): 1539.42,4022.75 1530.42,4031.75 1493.42,4031.75 1314.42,4031.75 1305.01,4022.34 1305.01,3360.92 1428.34,3360.92 1428.34,3152.47 1539.42,3152.47
24V on Top Layer "24V_L01_P210" (solid, pour order 210): 329.26,4022.75 338.26,4031.75 375.26,4031.75 554.26,4031.75 563.67,4022.34 563.67,3360.92 440.35,3360.92 440.35,3152.47 329.26,3152.47
NetD13_2 on Top Layer "NETD13_2_L01_P209" (solid, pour order 209): 839.42,4022.75 830.42,4031.75 793.42,4031.75 614.42,4031.75 605.01,4022.34 605.01,3360.92 728.34,3360.92 728.34,3152.47 839.42,3152.47
NetD11_2 on Top Layer "NETD11_2_L01_P207" (solid, pour order 207): 1030,-7 1039,-16 1076,-16 1255,-16 1264.41,-6.59 1264.41,654.83 1141.08,654.83 1141.08,863.28 1030,863.28
24V on Top Layer "24V_L01_P206" (solid, pour order 206): 840.16,-7 831.16,-16 794.16,-16 615.16,-16 605.74,-6.59 605.74,654.83 729.07,654.83 729.07,863.28 840.16,863.28
NetD10_2 on Top Layer "NETD10_2_L01_P205" (solid, pour order 205): 330,-7 339,-16 376,-16 555,-16 564.41,-6.59 564.41,654.83 441.08,654.83 441.08,863.28 330,863.28
3V3 on Bottom Layer "3V3_L02_P195" (solid, remove dead copper, pour order 195): 543.22,2101.49 543.22,2846.21 721.65,2845.58 729,2049 96,2049 81.96,2034.96 81.96,1716.55 96.51,1702 218.11,1702 235,1718.89 235,1859.28 254.1,1878.38 456.72,1878.38 456.72,1282 380,1282 380,1041.86 2048.09,1041.86 2048.09,682 2474,682 2474,2989.25 180,2989.25 180,2101.49
24V on Bottom Layer "24V_L02_P196" (solid, pour order 196): 1485,3360.92 1485,3009.39 2495,3009.39 2495,660 475,660 475,228.85 2953.4,228.85 2953.4,3290 2779.88,3290 2779.88,3700 475,3700 475,3360.92
GND on Bottom Layer "GND_L02_P215" (solid, remove dead copper, pour order 215): -117.84,-121.48 -117.84,4130.85 2953.4,4130.85 2953.4,-121.48
5V on Bottom Layer "5V_L02_P194" (solid, pour order 194): 974.8,1630 1005.63,1599.17 2173.17,1599.17 2199,1625 2199,2326 2170,2355 997.08,2355 974.8,2332.72

## Other copper
Top Layer:
  rectangle net GND: 2279.84,2173.06 2359.84,2310.61
  rectangle net 24V: 2379.84,2173.06 2897,2299
  rectangle net GND: 2068.24,1095.56 2082.71,1183.85
  rectangle net VIN: 2184.06,3086.65 2326.21,3139.84
  rectangle net GND: 2074.08,3149.84 2155.89,3177.24
  rectangle net GND: 527.74,1706.21 616,1725.11
  rectangle net GND: 2322.63,2540.08 2390.38,2680.23
  rectangle net 3V3: 1942.63,2549 2063.44,2706.65
  rectangle net NetQ2_3: 1975.3,1431.71 2054.7,1520.78
  rectangle net NetC2_1: 2185.48,3190.24 2377.39,3230
  rectangle net NetC2_1: 2335.27,3149.25 2369.12,3202.44
  rectangle net NetQ1_4: 2184.06,3149.25 2326.21,3177.24
  region net NetC7_1: 2155.06,3282.54 2094.48,3282.54 2094.48,3190.24 2155.06,3190.24
  rectangle net GND: 2791.65,3026.42 2950,3605.13
  rectangle net 3V3: 546.58,1734.38 564.57,1802.56
  rectangle net NetD1_1: 1865.18,3424.4 2146.9,3545.31
  rectangle net GND: 2379.87,2319.99 2679.08,2521.24
  rectangle net GND: 2329.36,2650.55 2438.62,2742.8
  rectangle net NetR3_1: 2455,2015.07 2527.68,2159.28
  rectangle net NetR3_1: 2382.43,2135.66 2527.68,2159.28
  rectangle net 3V3: 2014.61,2655.67 2144.29,2706.65
  rectangle net 5V: 1942.63,2331 2339.84,2417.52
  rectangle net 5V: 2276.51,2331 2339.87,2521.24
  rectangle net GND: 2279.84,2173.06 2339.84,2305.99
  rectangle net NetC8_1: 1942.63,2009.59 2264,2159.28
  rectangle net NetC8_1: 1942.63,2135.66 2327.31,2159.28
  rectangle net 5V: 1942.63,2235.99 2264,2417.52
  rectangle net 5V: 2276.51,2463.46 2312.63,2597.32
  rectangle net NetC15_2: 2077.36,2549 2264,2643.17
  rectangle net NetC15_2: 2077.36,2604.6 2312.63,2643.17
  region net GND: 763.15,3132.43 567.15,3132.43 567.15,3020.91 763.15,3020.91
  region net GND: 1463.15,3132.43 1267.15,3132.43 1267.15,3020.91 1463.15,3020.91
  rectangle net GND: 1106.27,883.31 1302.27,994.84
  rectangle net GND: 729.83,940.4 891.25,1078.2
  rectangle net GND: 406.27,883.31 602.27,994.84
  region net 3V3: 2109.93,737.89 2086.22,737.89 2086.22,713.23 2109.93,713.23
  rectangle net GND: 1758.16,513.46 1781.87,534.12
  rectangle net GND: 1808.16,513.46 1831.87,534.12
  region net GND: 1959.93,737.89 1936.22,737.89 1936.22,713.23 1959.93,713.23
  region net GND: 2059.9,1095.68 2036.28,1095.68 2036.28,1035.1 2059.9,1035.1
  rectangle net 3V3: 1986.28,1055.05 2009.9,1095.67
  rectangle net GND: 2284.53,1164.3 2308.23,1184.97
  pour cut-out: -118.11,0 ccw(c0,0) 0,-118.11 ccw(c0,0) 118.11,0 ccw(c0,0) 0,118.11 ccw(c0,0)
  pour cut-out: -118.85,4015.75 ccw(c-0.74,4015.75) -0.74,3897.64 ccw(c-0.74,4015.75) 117.37,4015.75 ccw(c-0.74,4015.75) -0.74,4133.86 ccw(c-0.74,4015.75)
  pour cut-out: 2716.17,4016.12 ccw(c2834.28,4016.12) 2834.28,3898.01 ccw(c2834.28,4016.12) 2952.39,4016.12 ccw(c2834.28,4016.12) 2834.28,4134.23 ccw(c2834.28,4016.12)
  pour cut-out: 2716.17,0.37 ccw(c2834.28,0.37) 2834.28,-117.74 ccw(c2834.28,0.37) 2952.39,0.37 ccw(c2834.28,0.37) 2834.28,118.48 ccw(c2834.28,0.37)
  pour cut-out: 2236.38,1335.29 2261.68,1310 2261.68,1145.85 2364.23,1145.85 2364.23,1097.76 2431.41,1097.76 2431.41,958.95 2130.1,958.95 2130.1,746.6 1757.62,746.6 1757.62,1055.05 1880.59,1055.05 1880.59,1146.84 2036.28,1146.84 2036.28,1014.54 1963.38,1014.54 1963.38,887.84 2082.79,887.84 2082.79,1183.85 1962.26,1183.85 1962.26,1431.71 2152.58,1431.71 2152.58,1335.29
  pour cut-out: 2368.88,741.85 2223.89,741.85 2223.89,887.84 2368.88,887.84
  pour cut-out: 243.29,873.29 210,840.06 -25,840.06 -25,1082.32 243.29,1082.32
  pour cut-out: 1302.65,2911.53 1268.34,2911.53 1268.34,3010.9 1420.15,3010.9 1420.15,2764.83 1154.98,2764.83 1154.98,2893.53 1302.65,2893.53
  pour cut-out: 765.2,2764.83 765.2,2814.01 720.15,2814.01 720.15,3010.9 568.34,3010.9 568.34,2911.53 602.65,2911.53 602.65,2893.53 454.98,2893.53 454.98,2775.83 569.47,2775.83 569.47,2764.83
  pour cut-out: 440.35,3360.92 728.3,3360.92 728.3,3132.08 440.35,3132.08
  pour cut-out: 1140.35,3360.92 1428.3,3360.92 1428.3,3132.08 1140.35,3132.08
  pour cut-out: 1429.07,654.83 1141.12,654.83 1141.12,883.67 1429.07,883.67
  pour cut-out: 729.07,654.83 441.12,654.83 441.12,883.67 729.07,883.67
  pour cut-out: 1266.77,1104.22 1301.08,1104.22 1301.08,1004.85 1149.27,1004.85 1149.27,1264.71 1414.44,1264.71 1414.44,1122.22 1266.77,1122.22
  pour cut-out: 566.77,1104.22 601.08,1104.22 601.08,1004.85 449.27,1004.85 449.27,1190.74 654.93,1190.74 654.93,1122.22 566.77,1122.22
  pour cut-out: 88.31,1573.21 88.31,1541.14 -13.09,1541.14 -13.09,1573.21 -65.36,1573.21 -65.36,1716.27 88.31,1716.27
Bottom Layer:
  pour cut-out: -118.11,0 ccw(c0,0) 0,-118.11 ccw(c0,0) 118.11,0 ccw(c0,0) 0,118.11 ccw(c0,0)
  pour cut-out: -118.85,4015.75 ccw(c-0.74,4015.75) -0.74,3897.64 ccw(c-0.74,4015.75) 117.37,4015.75 ccw(c-0.74,4015.75) -0.74,4133.86 ccw(c-0.74,4015.75)
  pour cut-out: 2716.17,0.37 ccw(c2834.28,0.37) 2834.28,-117.74 ccw(c2834.28,0.37) 2952.39,0.37 ccw(c2834.28,0.37) 2834.28,118.48 ccw(c2834.28,0.37)
  pour cut-out: 2716.17,4016.12 ccw(c2834.28,4016.12) 2834.28,3898.01 ccw(c2834.28,4016.12) 2952.39,4016.12 ccw(c2834.28,4016.12) 2834.28,4134.23 ccw(c2834.28,4016.12)

## Silkscreen, mask and mechanical layers (free items; w line width, h text height)
Top Overlay:
  lines w5: 80.3,1562.64 109.06,1562.64 109.06,1550.14 ; 80.63,1606.71 108.67,1606.71 109.06,1606.71 110.23,1606.71 110.23,1626.27 ; 563.28,1092.13 550.77,1092.13 550.77,1172.53 657.64,1172.53 657.64,1092.13 604.2,1092.13 ; 565.22,2923.62 511.78,2923.62 511.78,2843.21 618.65,2843.21 618.65,2923.62 606.14,2923.62 ; 1264.22,1092.03 1251.72,1092.03 1251.72,1172.44 1358.58,1172.44 1358.58,1092.03 1305.15,1092.03 ; 1265.22,2924.62 1211.78,2924.62 1211.78,2844.21 1318.65,2844.21 1318.65,2924.62 1306.14,2924.62
  lines w7.5: 2400,700 2172.38,700 2172.38,800 2400,800 ; 232.97,2838.77 362.41,2838.77 362.41,2970.6 232.97,2970.6 232.97,2838.77 ; 806.61,1045 936.05,1045 936.05,1179.45 806.61,1179.45 806.61,1045 ; 933.54,2838.69 1062.98,2838.69 1062.98,2971 933.54,2971 933.54,2838.69 ; 1517.45,1045 1646.89,1045 1646.89,1179.45 1517.45,1179.45 1517.45,1045 ; 1663.28,2290 1910,2290 1910,2420 1663.28,2420 1663.28,2290 ; 1728.09,1476.33 1861.86,1476.33 1861.86,1609.33 1728.09,1609.33 1728.09,1476.33 ; 1888,1476 2019,1476 2019,1570 1888,1570 1888,1476 ; 1915,700 2130,700 2130,800 1915,800 1915,700 ; 1933,2354 2176.23,2354 2176.23,2508.36 1933,2508.36 1933,2354 ; 2575,400 2825,400 2825,530 2575,530 2575,400 ; 2575,560 2902.75,560 2902.75,695 2575,695 2575,560
  lines w10: 366.4,2883.44 508.71,2883.44 ; 660.71,1132.31 803.02,1132.31 ; 1065.81,2884.43 1208.95,2884.43 ; 1371.55,1132.31 1513.86,1132.31 ; 1866.3,1519.11 1886.21,1519.11 ; 1911.8,2382.7 1930.8,2382.7
  text "GND" at 2218.81,3759.75 h78.74 r180
  text "+24V" at 2447.13,3759.75 h78.74 r180
  text "+24V" at 572.93,3752.75 h78.74 r180
  text "OUT" at 822.03,3752.74 h78.74 r180
  text "+24V" at 1272.93,3752.75 h78.74 r180
  text "OUT" at 1522.03,3752.74 h78.74 r180
  text "POWER IN" at 2447.13,3687.02 h100 r180
  text "SOLENOID-4" at 827.53,3676.62 h100 r180
  text "SOLENOID-3" at 1526.79,3676.62 h100 r180
  text "STATUS" at 275.79,2765.32 h78.74
  text "STATUS" at 975.79,2765.32 h78.74
  text "Canagey 1.0" at 45.74,2746.52 h200 r90
  text "FUSE" at 2675.35,2590.16 h78.74 r90
  text "TAG" at 218.24,2455.94 h78.74
  text "SOLENOID 4" at 771.84,2455.94 h78.74
  text "SOLENOID 3" at 1319.08,2455.94 h78.74
  text "TX" at -38.37,2392.25 h60 r90
  text "RX" at -38.37,2300.64 h60 r90
  text "GND" at -38.37,2169.13 h60 r90
  text "UART" at -89,2162.13 h78.74 r90
  text "24V" at 2703.22,1887.84 h60
  text "SOLENOID 1" at 771.84,1865.38 h78.74
  text "SOLENOID 2" at 1319.08,1865.38 h78.74
  text "CAN IN" at 1940.32,1865.38 h78.74
  text "BOOT" at -97.42,1834.08 h78.74 r90
  text "5V0" at 2704.22,1756.6 h60
  text "3V3" at 2704.28,1624.88 h60
  text "RESET" at -97.92,1567.36 h78.74 r90
  text "ID0" at 36.25,1391.78 h60 r90
  text "ID1" at 136.25,1391.78 h60 r90
  text "STATUS" at 629.83,1199.22 h78.74
  text "STATUS" at 1329.82,1199.22 h78.74
  text "RS485" at 2499.97,1073.26 h78.74 r90
  text "CAN" at 1797.63,1072.39 h78.74 r90
  text "2" at 2128.7,806.67 h60
  text "1" at 2371.85,801.79 h60
  text "SLAVE CAN IN" at 1856.04,567.92 h100
  text "1" at 2536.68,557.3 h60
  text "2" at 2541.55,403.72 h60
  text "SOLENOID-1" at 347.39,339.12 h100
  text "SOLENOID-2" at 1042.72,339.12 h100
  text "OUT" at 347.39,263 h78.74
  text "+24V" at 596.49,263 h78.74
  text "OUT" at 1047.39,263 h78.74
  text "+24V" at 1296.49,263 h78.74
Bottom Overlay:
  text "Rev-v2.0" at -84.99,2952.07 h60 r270
  text "SOLENOID BOARD" at 43.36,2792.2 h60 r270
Board Outline:
  the board outline again, w10
Fabrication:
  drawing of 191 lines, arcs and shapes, not listed
  text "Layer" at 3720.34,4070 h60
  text "Name" at 4130.26,4070 h60
  text "Material" at 5060,4070 h60
  text "Thickness" at 5919.77,4070 h60
  text "Constant" at 6569.6,4070 h60
  text "Board Layer Stack" at 7139.46,4070 h60
  text "Top Overlay" at 4130.26,3950 h60
  text "Top Solder" at 4130.26,3830 h60
  text "Solder Resist" at 5060,3830 h60
  text "0.010mm" at 5919.77,3830 h60
  text "3.5" at 6569.6,3830 h60
  text "1" at 3720.34,3710 h60
  text "Top Layer" at 4130.26,3710 h60
  text "0.035mm" at 5919.77,3710 h60
  text "Dielectric 1" at 4130.26,3590 h60
  text "FR-4" at 5060,3590 h60
  text "1.500mm" at 5919.77,3590 h60
  text "4.6" at 6569.6,3590 h60
  text "2" at 3720.34,3470 h60
  text "Bottom Layer" at 4130.26,3470 h60
  text "0.035mm" at 5919.77,3470 h60
  text "Bottom Solder" at 4130.26,3350 h60
  text "Solder Resist" at 5060,3350 h60
  text "0.010mm" at 5919.77,3350 h60
  text "3.5" at 6569.6,3350 h60
  text "Bottom Overlay" at 4130.26,3230 h60
  text "Total board thickness:" at 3720.34,3110 h60
  text "1.590mm" at 5919.77,3110 h60
Drill Drawing:
  circle w10: c-91.48,6493.33 r33.33
  lines w10: -124.82,4976.67 -108.15,4976.67 -108.15,4960 -74.82,4960 -74.82,4976.67 -58.15,4976.67 -58.15,5010 -74.82,5010 -74.82,5026.67 -108.15,5026.67 -108.15,5010 -124.82,5010 -124.82,4976.67 ; -124.82,5110 -58.15,5110 -58.15,5176.67 -124.82,5176.67 -124.82,5110 ; -124.82,5260 -58.15,5260 -58.15,5326.67 -124.82,5326.67 -124.82,5260 ; -124.82,5476.67 -58.15,5476.67 -91.48,5410 -124.82,5476.67 ; -124.82,5560 -124.82,5576.67 -108.15,5593.33 -124.82,5610 -124.82,5626.67 -108.15,5626.67 -91.48,5610 -74.82,5626.67 -58.15,5626.67 -58.15,5610 -74.82,5593.33 -58.15,5576.67 -58.15,5560 -74.82,5560 -91.48,5576.67 -108.15,5560 -124.82,5560 ; -124.82,5726.67 -108.15,5726.67 -108.15,5710 -74.82,5710 -74.82,5726.67 -58.15,5726.67 -58.15,5760 -74.82,5760 -74.82,5776.67 -108.15,5776.67 -108.15,5760 -124.82,5760 -124.82,5726.67 ; -124.82,5860 -124.82,5876.67 -108.15,5893.33 -124.82,5910 -124.82,5926.67 -108.15,5926.67 -91.48,5910 -74.82,5926.67 -58.15,5926.67 -58.15,5910 -74.82,5893.33 -58.15,5876.67 -58.15,5860 -74.82,5860 -91.48,5876.67 -108.15,5860 -124.82,5860 ; -124.82,6010 -91.48,6026.67 -58.15,6010 -74.82,6043.33 -58.15,6076.67 -91.48,6060 -124.82,6076.67 -108.15,6043.33 -124.82,6010 ; -124.82,6176.67 -108.15,6176.67 -91.48,6160 -74.82,6176.67 -58.15,6176.67 -74.82,6193.33 -58.15,6210 -74.82,6210 -91.48,6226.67 -108.15,6210 -124.82,6210 -108.15,6193.33 -124.82,6176.67 ; -124.82,6343.33 -91.48,6310 -58.15,6343.33 -91.48,6376.67 -124.82,6343.33 ; -111.48,4983.33 -101.48,4983.33 -101.48,4973.33 -81.48,4973.33 -81.48,4983.33 -71.48,4983.33 -71.48,5003.33 -81.48,5003.33 -81.48,5013.33 -101.48,5013.33 -101.48,5003.33 -111.48,5003.33 -111.48,4983.33 ; -111.48,5123.33 -71.48,5123.33 -71.48,5163.33 -111.48,5163.33 -111.48,5123.33 ; -111.48,5873.33 -111.48,5883.33 -101.48,5893.33 -111.48,5903.33 -111.48,5913.33 -101.48,5913.33 -91.48,5903.33 -81.48,5913.33 -71.48,5913.33 -71.48,5903.33 -81.48,5893.33 -71.48,5883.33 -71.48,5873.33 -81.48,5873.33 -91.48,5883.33 -101.48,5873.33 -111.48,5873.33
  lines w15: -184.61,4915 10946.28,4915 ; -184.61,6565 10946.28,6565 ; 366.27,4765 366.27,6715 ; 966.11,4765 966.11,6715 ; 2115.77,4765 2115.77,6715 ; 2621.65,4765 2621.65,6715 ; 3355.45,4765 3355.45,6715 ; 4855,4765 4855,6715 ; 5444.85,4765 5444.85,6715 ; 6190.65,4765 6190.65,6715 ; 7380.3,4765 7380.3,6715 ; 8234.06,4765 8234.06,6715 ; 9567.67,4765 9567.67,6715 ; -184.61,4765 10946.28,4765 10946.28,6715 -184.61,6715 -184.61,4765
  text "Symbol" at -94.61,6610 h72
  text "Count" at 411.27,6610 h72
  text "Hole Size" at 1011.11,6610 h72
  text "Plated" at 2160.77,6610 h72
  text "Hole Type" at 2666.65,6610 h72
  text "Drill Layer Pair" at 3400.45,6610 h72
  text "Via/Pad" at 4900,6610 h72
  text "Pad Shape" at 5489.85,6610 h72
  text "Template" at 6235.65,6610 h72
  text "Description" at 7425.3,6610 h72
  text "Hole Tolerance (+)" at 8279.06,6610 h72
  text "Hole Tolerance (-)" at 9612.67,6610 h72
  text "1" at 411.27,6460 h60
  text "98.43mil (2.500mm)" at 1011.11,6460 h60
  text "NPTH" at 2160.77,6460 h60
  text "Round" at 2666.65,6460 h60
  text "Top Layer - Bottom Layer" at 3400.45,6460 h60
  text "Pad" at 4900,6460 h60
  text "Rounded" at 5489.85,6460 h60
  text "c0hn250p0" at 6235.65,6460 h60
  text "2" at 411.27,6310 h60
  text "125.98mil (3.200mm)" at 1011.11,6310 h60
  text "NPTH" at 2160.77,6310 h60
  text "Round" at 2666.65,6310 h60
  text "Top Layer - Bottom Layer" at 3400.45,6310 h60
  text "Pad" at 4900,6310 h60
  text "Rounded" at 5489.85,6310 h60
  text "c0hn320p0" at 6235.65,6310 h60
  text "3" at 411.27,6160 h60
  text "39.02mil (0.991mm)" at 1011.11,6160 h60
  text "NPTH" at 2160.77,6160 h60
  text "Round" at 2666.65,6160 h60
  text "Top Layer - Bottom Layer" at 3400.45,6160 h60
  text "Pad" at 4900,6160 h60
  text "Rounded" at 5489.85,6160 h60
  text "c0hn99" at 6235.65,6160 h60
  text "4" at 411.27,6010 h60
  text "93.50mil (2.375mm)" at 1011.11,6010 h60
  text "NPTH" at 2160.77,6010 h60
  text "Round" at 2666.65,6010 h60
  text "Top Layer - Bottom Layer" at 3400.45,6010 h60
  text "Pad" at 4900,6010 h60
  text "Rounded" at 5489.85,6010 h60
  text "c0hn238" at 6235.65,6010 h60
  text "4" at 411.27,5860 h60
  text "122.05mil (3.100mm)" at 1011.11,5860 h60
  text "PTH" at 2160.77,5860 h60
  text "Round" at 2666.65,5860 h60
  text "Top Layer - Bottom Layer" at 3400.45,5860 h60
  text "Pad" at 4900,5860 h60
  text "Rounded" at 5489.85,5860 h60
  text "c0h310" at 6235.65,5860 h60
  text "7" at 411.27,5710 h60
  text "35.43mil (0.900mm)" at 1011.11,5710 h60
  text "PTH" at 2160.77,5710 h60
  text "Round" at 2666.65,5710 h60
  text "Top Layer - Bottom Layer" at 3400.45,5710 h60
  text "Pad" at 4900,5710 h60
  text "(Mixed)" at 5489.85,5710 h60
  text "(Mixed)" at 6235.65,5710 h60
  text "8" at 411.27,5560 h60
  text "39.37mil (1.000mm)" at 1011.11,5560 h60
  text "PTH" at 2160.77,5560 h60
  text "Round" at 2666.65,5560 h60
  text "Top Layer - Bottom Layer" at 3400.45,5560 h60
  text "Pad" at 4900,5560 h60
  text "Rounded" at 5489.85,5560 h60
  text "c152h100m163mx163p0" at 6235.65,5560 h60
  text "8" at 411.27,5410 h60
  text "59.06mil (1.500mm)" at 1011.11,5410 h60
  text "PTH" at 2160.77,5410 h60
  text "Round" at 2666.65,5410 h60
  text "Top Layer - Bottom Layer" at 3400.45,5410 h60
  text "Pad" at 4900,5410 h60
  text "(Mixed)" at 5489.85,5410 h60
  text "(Mixed)" at 6235.65,5410 h60
  text "10" at 411.27,5260 h60
  text "62.99mil (1.600mm)" at 1011.11,5260 h60
  text "PTH" at 2160.77,5260 h60
  text "Round" at 2666.65,5260 h60
  text "Top Layer - Bottom Layer" at 3400.45,5260 h60
  text "Pad" at 4900,5260 h60
  text "Rounded" at 5489.85,5260 h60
  text "c280h160" at 6235.65,5260 h60
  text "20" at 411.27,5110 h60
  text "28.35mil (0.720mm)" at 1011.11,5110 h60
  text "PTH" at 2160.77,5110 h60
  text "Round" at 2666.65,5110 h60
  text "Top Layer - Bottom Layer" at 3400.45,5110 h60
  text "Pad" at 4900,5110 h60
  text "Rounded" at 5489.85,5110 h60
  text "c110h72m120mx120p0" at 6235.65,5110 h60
  text "163" at 411.27,4960 h60
  text "11.81mil (0.300mm)" at 1011.11,4960 h60
  text "PTH" at 2160.77,4960 h60
  text "Round" at 2666.65,4960 h60
  text "Top Layer - Bottom Layer" at 3400.45,4960 h60
  text "Via" at 4900,4960 h60
  text "Rounded" at 5489.85,4960 h60
  text "v60h30" at 6235.65,4960 h60
  text "230 Total" at 411.27,4810 h60

## Dimensions
2991.76,4173.6 to 2991.76,-157.11 on Dimensions
-157.85,4173.6 to 2991.76,4173.6 on Dimensions

## Text inside footprints (layer, text, board x,y; h text height)
J1: Top Overlay "1" at 2854.47,2725.17 h31.5 r270
SW2: Top Overlay "ON" at -14.26,1249.24 h19.68; Top Overlay "1" at 6.61,1052.42 h19.68; Top Overlay "2" at 106.61,1053.12 h19.68